# Altium PCB EFI.PcbDoc (part 3 of 3)
Units mm, origin at the board's own origin, x right, y up, seen from the top; angles counter-clockwise.
Board outline 100.1 x 100.83 mm, 2 copper layers (Top Layer, Bottom Layer), stack 1.57 mm thick; 101 components, 85 nets, 326 pads, 97 vias.
Unrouted connection lines stored in the file: 58.
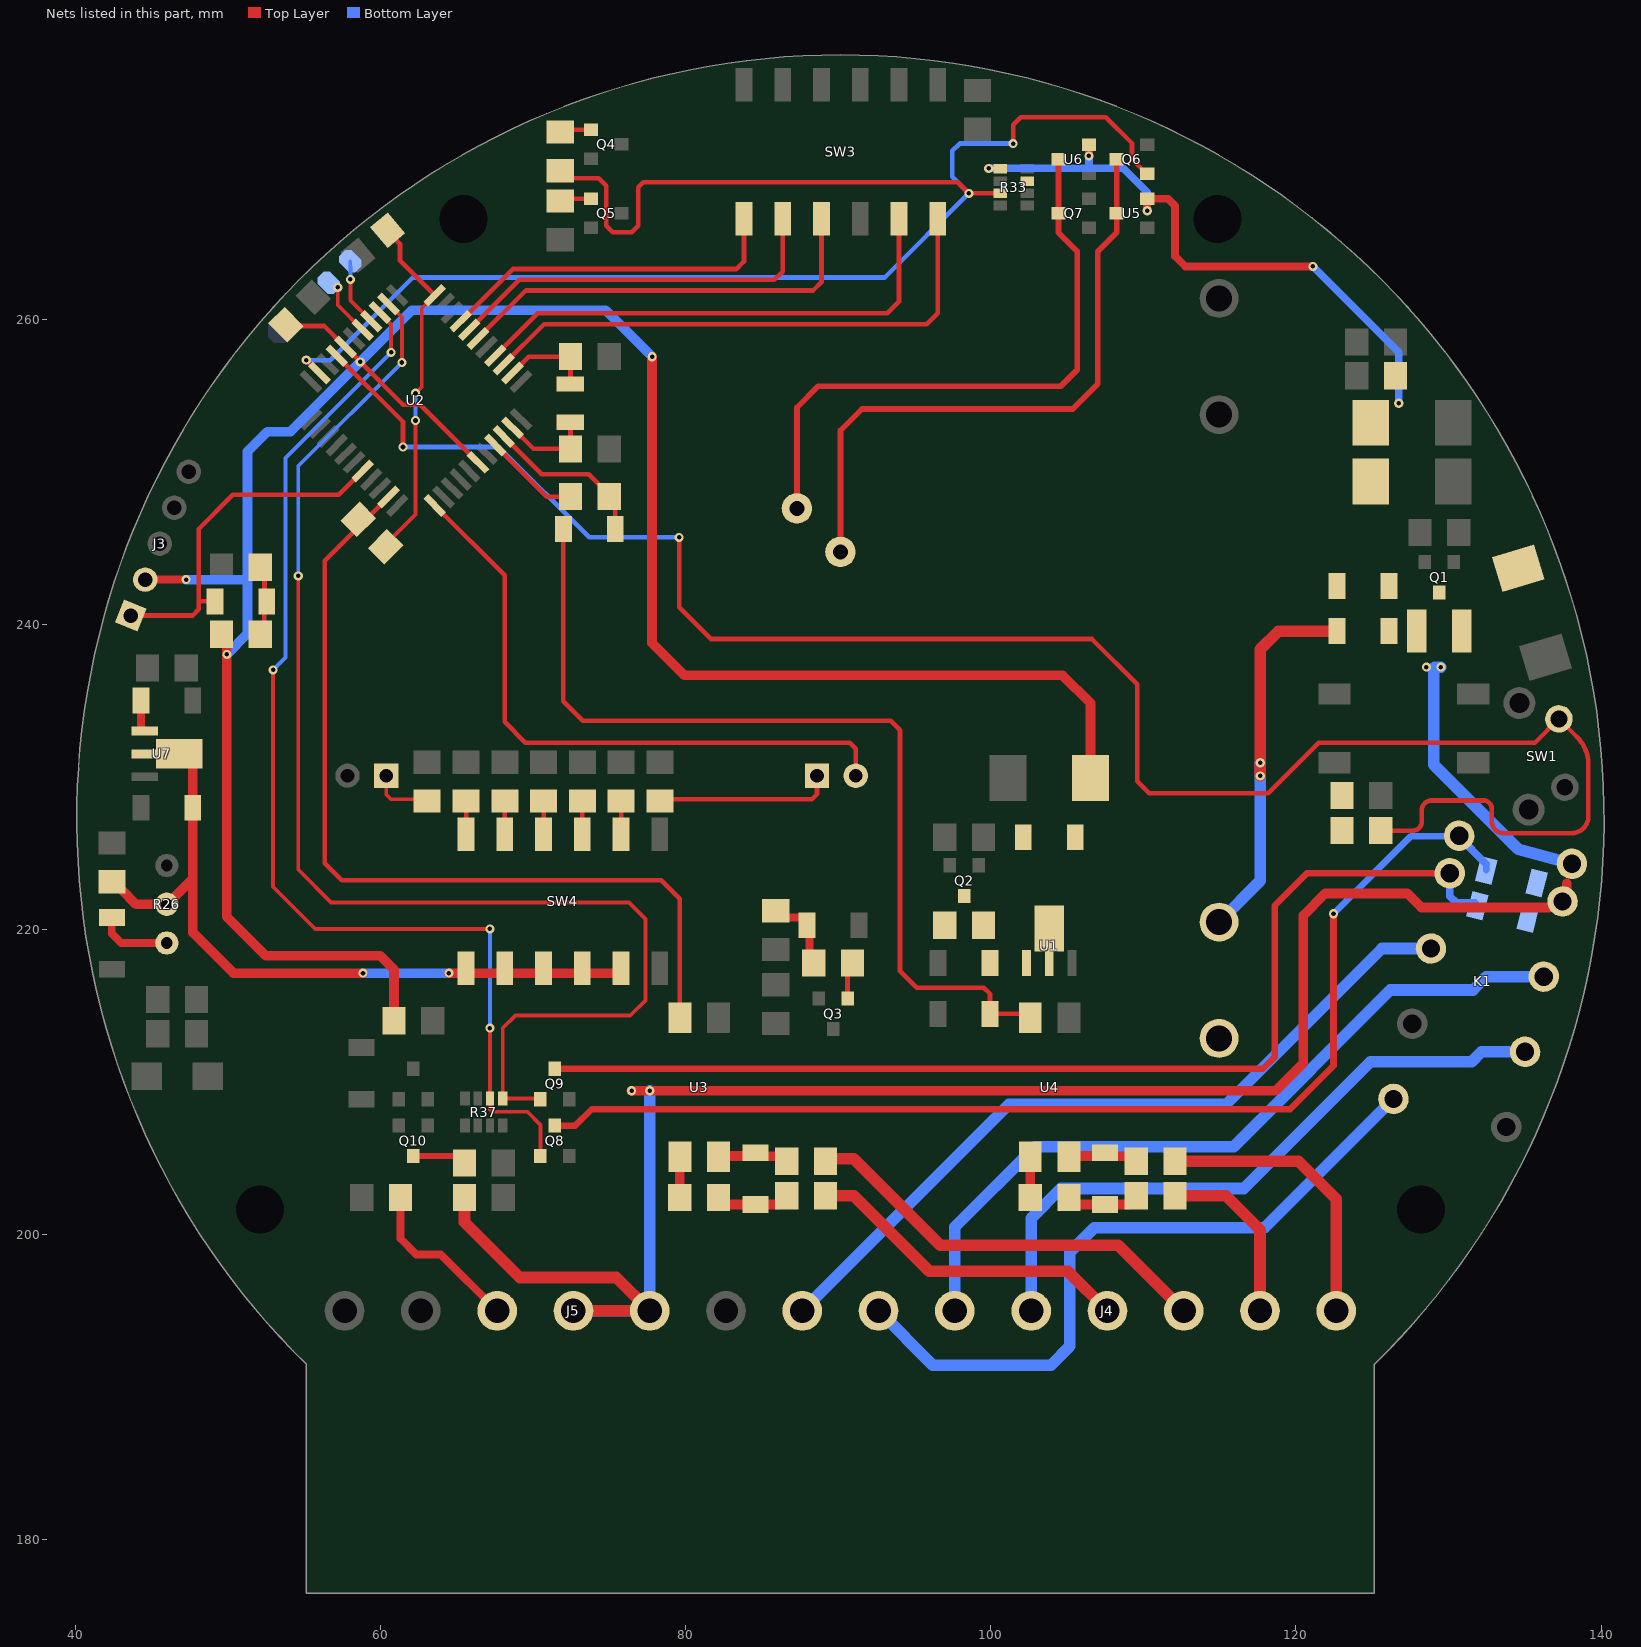
[diagram p2: the nets of this part, all layers, seen from the top]

## Via types
v1: diameter 0.6, hole 0.3, Top Layer to Bottom Layer, 97 vias

## Nets (pads, with @x,y where several pads share a name; then routed paths per layer and width w, separated by ;. In a path a pad name is that pad's centre, name@x,y a point inside that pad or via, vN(x,y) a via of type N, cw(c..) or ccw(c..) an arc to the next point about the centre after c; other vN are vias at no path point) (continued)
LDRV_2: Q6.1 R24.2 R33.7 U2.10 | length 104.2
  Top Layer w0.305: v1(55.133,257.305) 55.148,257.305 55.987,256.466 U2.10@56.002,256.466 ; R24.2@71.78,269.723 72.264,269.239 74.309,269.239 74.803,268.745 74.803,266.109 75.223,265.689 76.473,265.689 76.896,266.111 76.896,268.628 77.225,268.958 97.843,268.958 v1(98.562,268.239) R33.7@100.623,268.239 ; v1(101.464,271.501) 101.464,272.739 101.954,273.229 107.54,273.229 109.254,271.516 109.254,270.459 109.946,269.767 110.204,269.509 Q6.1@110.254,269.509
  Bottom Layer w0.305: v1(55.133,257.305) 56.708,257.305 62.127,262.724 93.047,262.724 v1(98.562,268.239) 97.484,269.317 97.484,271.017 97.967,271.501 v1(101.464,271.501)
MCLR: D6.1 J3.1 U2.18 | length 23.3
  Top Layer w0.305: J3.1@43.628,240.566 47.676,240.566 48.083,240.974 48.083,241.5 ; D6.1@49.151,241.5 48.083,241.5 ; U2.18@58.83,250.043 57.271,248.484 50.329,248.484 48.083,246.239 48.083,241.5
NetC8_2: C8.2 D6.2 R8.1 | length 4.8
  Top Layer w0.305: R8.1@52.121,239.341 52.386,239.606 52.386,241.335 D6.2@52.551,241.5 52.397,241.653 52.397,243.459 C8.2@52.121,243.735
NetC11_2: C11.2 D15.1 R26.2 SW4.1 SW4.2 SW4.3 SW4.4 SW4.5 U7.2 | length 48.9
  Top Layer w0.635: C11.2@42.39,223.117 42.517,223.117 43.025,222.609 43.99,221.644 R26.2@45.997,221.644 47.697,223.344 ; U7.2@46.804,231.497 46.984,231.497 47.697,230.784 D15.1@47.697,227.969 47.697,223.344 ; v1(58.852,217.13) 50.363,217.13 47.697,219.797 47.697,223.344 ; v1(64.478,217.13) 67.853,217.13 SW4.2@68.149,217.426 ; SW4.2@68.149,217.438 SW4.2@68.149,217.426 ; SW4.3@70.689,217.438 SW4.3@70.689,217.426 ; SW4.4@73.229,217.438 SW4.4@73.229,217.426 ; SW4.5@75.769,217.438 75.769,217.426 75.473,217.13 73.525,217.13 SW4.4@73.229,217.426 ; SW4.2@68.149,217.426 68.445,217.13 70.393,217.13 SW4.3@70.689,217.426 ; SW4.3@70.689,217.426 70.985,217.13 72.933,217.13 SW4.4@73.229,217.426
  Bottom Layer w0.635: v1(58.852,217.13) v1(64.478,217.13)
NetD1_2: D1.2 U1.1
NetD4_2: D4.2 L1.2 Q1.3
NetD5_2: D5.2 R9.1 U2.31 | length 10.9
  Top Layer w0.305: U2.31@68.082,252.305 70.565,249.822 73.654,249.822 74.988,248.488 R9.1@74.988,248.361 75.385,247.964 D5.2@75.385,246.228
NetD9_1: D9.1 R15.2 R16.1 | length 4.9
  Top Layer w0.635: R16.1@82.159,202.416 82.612,201.963 86.121,201.963 86.629,202.471 R15.2@86.629,202.54
NetD9_2: D9.2 R17.2 U3.2 | length 4.9
  Top Layer w0.635: U3.2@82.159,205.363 82.379,205.142 84.351,205.142 D9.2@84.572,205.363 84.804,205.13 86.299,205.13 R17.2@86.629,204.8
NetD11_1: D11.1 R18.1 R19.1 | length 4.9
  Top Layer w0.635: R19.1@105.129,202.416 105.582,201.963 109.091,201.963 109.599,202.471 R18.1@109.599,202.54
NetD11_2: D11.2 R20.1 U4.2 | length 4.9
  Top Layer w0.635: U4.2@105.129,205.363 105.349,205.142 107.321,205.142 107.542,205.363 107.774,205.13 109.269,205.13 R20.1@109.599,204.8
NetD12_1: D12.1 R21.1 R22.2 | length 5
  Top Layer w0.508: R21.1@85.903,221.219 86.354,220.768 87.666,220.768 D12.1@87.962,220.472 ; D12.1@87.962,220.269 88.117,220.114 88.117,218.065 R22.2@88.392,217.79
NetD14_1: D14.1 R26.3 | length 4.9
  Top Layer w0.508: D14.1@42.39,220.781 42.39,219.724 43.01,219.104 R26.3@45.997,219.104
NetD16_2: D16.2 U7.1 | length 2.2
  Top Layer w0.508: D16.2@44.299,235.001 44.299,233.033 44.335,232.997 U7.1@44.539,232.997
NetJ5_5: J5.5 R38.2 | length 11
  Top Layer w0.508: R38.2@61.317,202.416 61.317,199.719 62.345,198.691 63.945,198.691 J5.5@67.645,194.991
NetL2_R: L2.R Q6.3 U5.3 | length 41.3
  Top Layer w0.381: L2.R@90.145,244.733 90.145,252.692 91.554,254.102 105.366,254.102 107.013,255.749 107.013,264.433 108.254,265.674 U5.3@108.254,266.929 Q6.3@108.254,270.459
NetL2_S: L2.S Q7.3 U6.3 | length 40.3
  Top Layer w0.381: L2.S@87.295,247.583 87.295,254.205 88.682,255.592 104.581,255.592 105.668,256.68 105.668,264.433 104.428,265.674 Q7.3@104.428,266.929 U6.3@104.428,270.459
NetLED1_1: LED1.1 R13.2 | length 4
  Top Layer w0.254: LED1.1@60.376,230.073 60.376,228.843 60.692,228.527 63.039,228.527 R13.2@63.043,228.524
NetLED2_1: LED2.1 R14.2 | length 11.7
  Top Layer w0.305: R14.2@78.309,228.524 88.28,228.524 88.607,228.85 LED2.1@88.607,230.073
NetQ2_3: Q2.3 R1.1
NetQ3_1: Q3.1 R22.1 | length 2.5
  Top Layer w0.305: Q3.1@90.612,215.463 90.612,217.47 R22.1@90.932,217.79
NetQ4_1: Q4.1 R24.1 | length 2.1
  Top Layer w0.305: R24.1@71.78,272.263 71.918,272.4 Q4.1@73.803,272.4
NetQ5_1: Q5.1 R25.1 | length 2.1
  Top Layer w0.305: R25.1@71.78,267.741 71.918,267.879 Q5.1@73.803,267.879
NetQ10_3: Q10.3 R36.2 | length 3.5
  Top Layer w0.305: R36.2@65.042,205.137 R36.2@65.502,204.677
  Top Layer w0.381: Q10.3@62.154,205.137 R36.2@65.042,205.137
NetR9_2: R9.2 U2.30 | length 6.3
  Top Layer w0.305: U2.30@67.516,251.74 70.895,248.361 R9.2@72.448,248.361
NetR16_2: R16.2 U3.1 | length 2.9
  Top Layer w0.635: R16.2@79.619,202.416 U3.1@79.619,205.363
NetR19_2: R19.2 U4.1 | length 2.9
  Top Layer w0.635: R19.2@102.589,202.416 U4.1@102.589,205.363
NetR27_1: R27.1 SW4.12 | length 2.3
  Top Layer w0.305: SW4.12@65.609,226.238 R27.1@65.609,228.524
NetR28_1: R28.1 SW4.11 | length 2.3
  Top Layer w0.305: SW4.11@68.149,226.238 R28.1@68.149,228.524
NetR29_1: R29.1 SW4.10 | length 2.3
  Top Layer w0.305: SW4.10@70.689,226.238 R29.1@70.689,228.524
NetR30_1: R30.1 SW4.9 | length 2.3
  Top Layer w0.305: SW4.9@73.229,226.238 R30.1@73.229,228.523
NetR31_1: R31.1 SW4.8 | length 2.3
  Top Layer w0.305: SW4.8@75.769,226.238 R31.1@75.769,228.524
RC6: R6.1 R11.1 U2.44 | length 23.8
  Top Layer w0.254: R6.1@59.926,244.817 62.292,247.182 v1(62.292,253.35) ; v1(62.292,255.143) 62.703,255.555 62.703,260.704 U2.44@63.557,261.557
  Top Layer w0.305: R11.1@60.467,265.82 60.467,265.708 61.281,264.894 61.281,263.833 U2.44@63.557,261.557
  Bottom Layer w0.254: v1(62.292,253.35) v1(62.292,255.143)
RD6: TP1.2 U2.4 | length 4.5
  Top Layer w0.254: v1(58.028,262.601) 58.028,261.228 U2.4@59.396,259.86
  Bottom Layer w0.254: TP1.2@58.018,263.787 58.028,263.173 v1(58.028,262.601)
RD7: TP1.1 U2.5 | length 3.5
  Top Layer w0.254: v1(57.199,262.072) 57.199,260.925 U2.5@58.83,259.294
RLY_NC1: J4.6 K1.4 | length 50.9
  Bottom Layer w0.762: J4.6@97.645,194.991 97.645,200.489 102.911,205.756 115.917,205.756 126.188,216.027 131.601,216.027 132.474,216.9 K1.4@136.245,216.9
RLY_NC2: J4.5 K1.6 | length 43
  Bottom Layer w0.762: J4.5@102.645,194.991 102.645,201.07 104.586,203.011 116.568,203.011 124.885,211.328 131.521,211.328 132.164,211.971 K1.6@135.016,211.971
RLY_NO1: J5.1 K1.13 | length 51
  Bottom Layer w0.762: J5.1@87.645,194.991 101.173,208.519 115.418,208.519 125.642,218.743 K1.13@128.851,218.743
RLY_NO2: J4.7 K1.9 | length 46.1
  Bottom Layer w0.762: J4.7@92.645,194.991 96.196,191.439 103.945,191.439 105.181,192.676 105.181,198.831 106.782,200.431 117.939,200.431 K1.9@126.393,208.885
RLY_RESET: D7.2 K1.15 Q9.3 | length 73.3
  Top Layer w0.432: Q9.3@71.435,210.864 117.83,210.864 118.605,211.638 118.605,221.557 120.72,223.672 K1.15@130.08,223.672
  Bottom Layer w0.508: K1.15@130.08,223.672 130.08,222.171 130.527,221.723 131.713,221.723 D7.2@131.892,221.544
RLY_RESET_O: Q9.1 R37.5 U2.2 | length 86.9
  Top Layer w0.254: v1(54.61,243.167) 54.61,223.919 56.765,221.764 76.286,221.764 77.363,220.687 77.363,215.343 76.368,214.349 68.836,214.349 68.012,213.525 R37.5@68.012,208.907 70.442,208.907 Q9.1@70.485,208.864 ; U2.2@60.527,260.991 61.404,260.115 v1(61.404,257.15)
  Bottom Layer w0.254: v1(54.61,243.167) 54.61,250.356 v1(61.404,257.15)
RLY_SET: D8.2 K1.16 Q8.3 | length 76
  Top Layer w0.432: Q8.3@71.435,207.137 72.769,207.137 73.841,208.209 119.614,208.209 122.46,211.055 v1(122.46,221.022)
  Bottom Layer w0.432: v1(122.46,221.022) 127.549,226.111 130.668,226.111 K1.16@130.694,226.137 K1.16@130.694,226.049 ; D8.2@132.47,223.86 D8.2@132.47,224.273
  Bottom Layer w0.508: K1.16@130.694,226.049 D8.2@132.47,224.273
RLY_SET_O: Q8.1 R37.6 U2.3 | length 74.1
  Top Layer w0.254: v1(52.959,237.007) 52.959,222.79 55.723,220.026 v1(67.172,220.026) ; U2.3@59.962,260.426 59.962,260.382 60.693,259.65 v1(60.693,257.81) ; v1(67.172,213.525) R37.6@67.172,208.907 67.172,208.191 67.321,208.042 69.63,208.042 70.485,207.187 Q8.1@70.485,205.137
  Bottom Layer w0.254: v1(52.959,237.007) 53.775,237.823 53.775,250.892 v1(60.693,257.81) ; v1(67.172,213.525) v1(67.172,220.026)
RMT_CNT_SW: SW3.1 U2.41 | length 23
  Top Layer w0.305: U2.41@65.254,259.86 68.67,263.276 83.324,263.276 83.82,263.772 SW3.1@83.82,266.561
RSP_DELAY_1: SW3.5 U2.37 | length 33.4
  Top Layer w0.305: U2.37@67.516,257.597 70.294,260.375 93.216,260.375 93.98,261.14 SW3.5@93.98,266.561
RSP_DELAY_2: SW3.6 U2.36 | length 36
  Top Layer w0.305: U2.36@68.082,257.032 70.715,259.664 95.809,259.664 96.52,260.375 SW3.6@96.52,266.561
RST_TIME_1: SW3.2 U2.40 | length 25.6
  Top Layer w0.305: U2.40@65.819,259.294 69.091,262.566 85.817,262.566 86.36,263.109 SW3.2@86.36,266.561
RST_TIME_2: SW3.3 U2.39 | length 28.2
  Top Layer w0.305: U2.39@66.385,258.729 69.526,261.87 88.346,261.87 88.9,262.424 SW3.3@88.9,266.561
STATUS_LED: LED2.2 U2.23 | length 41.6
  Top Layer w0.305: U2.23@63.557,247.78 68.133,243.203 68.133,233.595 69.498,232.23 90.749,232.23 91.147,231.832 LED2.2@91.147,230.073
T1OS_I: C5.2 U2.35 X1.1 | length 6
  Top Layer w0.305: U2.35@68.648,256.466 69.722,257.54 C5.2@72.448,257.54 72.451,257.537 X1.1@72.451,255.742
T1OS_O: C6.2 U2.32 X1.2 | length 6.1
  Top Layer w0.305: U2.32@68.648,252.871 70.026,251.493 C6.2@72.448,251.493 72.451,251.496 X1.2@72.451,253.242
TEST_RST: R7.1 SW1.2 U2.8 | length 125.7
  Top Layer w0.305: U2.8@57.133,257.597 61.476,253.254 v1(61.476,251.611) ; v1(79.574,245.692) 79.574,241.117 81.664,239.027 106.635,239.027 109.601,236.06 109.601,229.707 110.381,228.927 118.177,228.927 121.481,232.232 135.67,232.232 SW1.2@137.233,233.795 138.423,232.605 cw(c136.627,230.809) 139.167,230.809 139.167,227.398 cw(c138.07,227.398) 138.07,226.302 133.609,226.302 cw(c133.609,227.069) 132.842,227.069 132.842,227.883 ccw(c132.278,227.883) 132.278,228.448 128.894,228.448 ccw(c128.894,227.798) 128.245,227.798 128.245,227.051 cw(c127.66,227.051) 127.66,226.466 R7.1@125.562,226.466
  Bottom Layer w0.305: v1(61.476,251.611) 67.761,251.611 73.68,245.692 v1(79.574,245.692)
V_AUX: C2.1 D3.1 D7.1 D8.1 J5.3 J5.4 K1.1 K1.2 L1.1 R34.2 | length 132.5
  Top Layer w0.635: v1(76.454,209.423) 76.458,209.419 v1(77.645,209.419) 118.672,209.419 120.48,211.227 120.48,220.918 121.914,222.352 127.299,222.352 128.214,221.437 136.581,221.437 137.744,222.6 137.744,223.026
  Top Layer w0.762: R34.2@65.502,202.416 65.502,200.797 69.119,197.179 75.456,197.179 J5.3@77.645,194.991 J5.4@72.645,194.991
  Bottom Layer w0.762: J5.4@72.645,194.991 J5.3@77.645,194.991 v1(77.645,209.419) ; v1(129.502,237.185) 129.108,237.185 129.032,237.109 129.032,230.781 134.564,225.249 K1.1@138.088,224.293
  other v1: 128.55,237.185
VAC_240_IN: D5.1 D10.1 U4.4 | length 60.4
  Top Layer w0.305: D5.1@71.985,246.228 71.985,234.96 73.269,233.676 93.432,233.676 94.052,233.056 94.052,217.266 95.139,216.179 99.543,216.179 99.947,215.775 D10.1@99.947,214.463 U4.4@102.589,214.463
VAC_240_L: J4.2 R18.2 | length 11.8
  Top Layer w0.762: R18.2@112.08,202.54 115.415,202.54 117.645,200.31 J4.2@117.645,194.991
VAC_240_N: J4.1 R20.2 | length 18.9
  Top Layer w0.762: R20.2@112.08,204.8 120.167,204.8 122.645,202.323 J4.1@122.645,194.991
VBAT: D2.2 D3.2 J1.1 R1.2 U1.2 | length 25.4
  Top Layer w0.762: v1(117.664,230.058) v1(117.664,230.922) 117.664,238.352 118.857,239.546 D3.2@122.696,239.546
  Bottom Layer w0.762: J1.1@114.96,220.472 117.664,223.176 v1(117.664,230.058) v1(117.664,230.922)
VBOOST: C3.1 C4.1 D4.1 R2.2 R33.3 R33.5 U5.2 U6.2 | length 41.3
  Top Layer w0.305: v1(99.862,269.875) 99.88,269.857 100.605,269.857 R33.5@100.623,269.839
  Top Layer w0.508: v1(106.428,270.689) U6.2@106.428,271.409 ; v1(110.254,267.093) U5.2@110.254,267.879 111.61,267.879 112.078,267.411 112.078,264.121 112.75,263.449 v1(121.107,263.449)
  Bottom Layer w0.508: v1(99.862,269.875) 106.428,269.875 ; v1(106.428,270.689) 106.428,269.875 ; v1(110.254,267.093) 110.254,268.301 108.68,269.875 106.428,269.875 ; v1(121.107,263.449) 126.739,257.817 v1(126.739,254.478)
VDC_110_N: J4.3 R17.1 | length 27.7
  Top Layer w0.762: R17.1@89.169,204.8 89.321,204.953 91.027,204.953 96.691,199.289 108.346,199.289 J4.3@112.645,194.991
VDC_110_P: J4.4 R15.1 | length 21.6
  Top Layer w0.762: R15.1@89.169,202.54 91.008,202.54 95.958,197.59 105.045,197.59 J4.4@107.645,194.991
VDC_110_RA2: R6.2 U2.21 U3.4 | length 57.5
  Top Layer w0.305: U2.21@60.527,248.345 56.334,244.153 56.334,224.328 57.451,223.212 78.41,223.212 79.619,222.003 U3.4@79.619,214.463
VDD_MCU: C1.1 C7.2 D2.1 J3.2 R7.2 R8.2 R10.2 R35.2 U2.7 U2.28 | length 157.3
  Top Layer w0.305: C7.2@53.799,259.628 54.661,259.628 54.75,259.538 54.755,259.543 56.318,259.543 U2.7@57.699,258.163 v1(58.672,257.19) 61.476,254.386 62.608,254.386 U2.28@66.385,250.608
  Top Layer w0.508: J3.2@44.58,242.921 v1(47.257,242.921)
  Top Layer w0.635: R8.2@49.355,239.566 R8.2@49.581,239.341 49.927,238.994 v1(49.927,238.023) 49.927,220.816 52.47,218.274 59.969,218.274 60.884,217.359 R35.2@60.884,214.008 ; v1(77.8,257.532) 77.8,238.77 79.918,236.652 104.708,236.652 106.531,234.829 C1.1@106.531,229.921
  Bottom Layer w0.635: v1(47.257,242.921) 51.287,242.921 ; v1(49.927,238.023) 49.934,238.023 51.287,239.376 51.287,242.921 ; v1(77.8,257.532) 74.751,260.581 62.063,260.581 v1(58.672,257.19) 54.103,252.621 52.595,252.621 51.287,251.313 51.287,242.921
pads on no net: K1.8 K1.11 U2.12 U2.13 U2.20 U2.33 U2.34
copper on no net: | length 66.5
  Top Layer w0.203: 65.145,178.968 65.145,189.241 ; 67.005,185.852 73.508,184.81 ; 75.145,178.968 75.145,189.241 ; 85.145,178.968 85.145,189.241 ; 105.145,178.968 105.145,189.241 ; 115.145,178.968 115.145,189.241 ; 67.688,187.071 ccw(c67.005,187.071) 67.688,187.071 ; 73.835,187.071 ccw(c73.152,187.071) 73.835,187.071

## Polygon pours and split planes (outlines as drawn)
GND on Top Layer "NONET_L-01_P-001" (solid, pour order 2): 136.666,235.128 134.99,233.451 121.972,233.451 121.972,236.122 134.187,236.122 134.187,240.995 137.647,240.995 138.511,235.128
V_AUX on Top Layer "NONET_L-01_P-001" (solid, pour order 0): 136.305,242.938 133.789,242.169 133.597,241.977 133.597,236.626 128.295,236.626 125.546,239.376 125.546,240.951 128.561,240.951 128.561,238.141 129.073,237.63 132.19,237.63 132.19,243.746 132.83,244.386 135.603,245.233
GND on Bottom Layer "NONET_L-01_P-001" (solid, remove dead copper, pour order 1): 134.84,226.779 131.724,229.895 131.724,238.176 126.67,238.176 126.67,227.19 113.754,214.274 81.445,214.274 81.445,191.491 55.145,191.491 cw(c90.145,227.267) 140.192,226.779

## Other copper
Top Layer:
  rectangle net GND: 134.208,227.103 138.414,230.209
  region net V_AUX: 135.883,220.864 138.373,220.243 139.552,224.974 137.063,225.595
  rectangle net GND: 129.103,247.861 131.503,254.696
  rectangle net NetC11_2: 46.337,227.119 48.844,232.464
  rectangle net VBAT: 103.541,216.925 104.121,221.158
  rectangle net VBOOST: 122.146,241.644 123.444,254.696
  rectangle net GND: 90.812,219.419 91.912,224.257
  rectangle net GND: 81.409,222.948 91.912,224.257
  rectangle net GND: 81.409,213.209 82.909,224.257
  rectangle net GND: 85.001,215.003 86.792,217.13
  rectangle net GND: 85.001,215.003 89.122,215.923
  rectangle net GND: 104.379,213.208 107.023,215.209
  rectangle net GND: 96.215,228.421 102.331,231.421
  rectangle net GND: 96.215,223.739 97.739,231.421
  rectangle net GND: 85.001,215.123 86.792,217.13
  rectangle net GND: 44.642,212.264 46.166,216.302
  rectangle net GND: 41.501,226.227 45.415,230.247
  rectangle net GND: 41.501,224.895 44.297,230.247
  rectangle net GND: 105.153,213.208 107.023,218.655
  rectangle net VBOOST: 125.771,253.399 127.295,257.173
  rectangle net VBOOST: 123.063,253.399 127.295,254.696
  rectangle net NetD4_2: 125.546,241.457 126.646,243.344
  rectangle net NetD4_2: 125.546,241.457 131.503,242.55
  rectangle net NetD4_2: 130.233,238.141 131.503,242.55
  rectangle net VBOOST: 101.375,268.855 102.843,269.17
  rectangle net VBOOST: 101.333,268.855 101.654,269.964
  rectangle net VBOOST: 100.173,269.643 101.654,269.964
  rectangle net V_AUX: 125.546,238.141 128.561,240.951
  rectangle net VDD_MCU: 104.623,225.185 123.784,227.355
  rectangle net VDD_MCU: 122.26,225.577 123.784,229.667
  rectangle net EXT_RST_I: 61.744,210.404 64.186,211.324
  rectangle net EXT_RST_I: 62.662,210.404 64.186,214.897
  rectangle net AUTO_RST_CT: 85.014,213.003 97.097,214.59
  rectangle net AUTO_RST_CT: 95.997,213.003 97.097,215.313
  rectangle net VBAT: 101.581,219.38 103.492,226.885
  rectangle net VDD_MCU: 104.623,225.185 107.731,231.421
  rectangle net NetQ2_3: 96.215,219.38 97.739,222.659
  rectangle net NetQ2_3: 96.215,221.598 99.607,222.659
  rectangle net NetD1_2: 99.397,216.925 102.5,218.655
  rectangle net VBAT: 101.581,219.38 116.827,222.402
  rectangle net VBAT: 98.755,219.38 116.827,221.158
  rectangle net VBAT: 113.068,211.592 116.827,222.402
  rectangle net NetC11_2: 43.586,230.784 48.844,232.156
  rectangle net NetC11_2: 46.337,230.53 48.844,232.464
  rectangle net VBOOST: 122.146,247.861 126.103,254.696
  text "5" at 77.299,189.755 h1.5
  text "1" at 57.382,189.738 h1.5
  text "2" at 62.303,189.738 h1.5
  text "3" at 67.303,189.747 h1.5
  text "4" at 72.288,189.741 h1.5
  text "6" at 82.312,189.747 h1.5
  text "7" at 87.31,189.747 h1.5
  text "8" at 92.308,189.747 h1.5
  text "9" at 97.312,189.747 h1.5
  text "10" at 101.967,189.747 h1.5
  text "11" at 107.009,189.738 h1.5
  text "12" at 111.968,189.738 h1.5
  text "13" at 116.975,189.747 h1.5
  text "14" at 121.975,189.738 h1.5
  text "0VAC" at 123.284,183.991 h2 r90
  text "0 VDC" at 113.284,183.742 h2 r90
  text "White" at 58.274,182.764 h2 r90
  text "Brown" at 63.274,182.663 h2 r90
  text "Brown" at 78.274,182.663 h2 r90
  text "White" at 83.274,182.664 h2 r90
  text "NO1" at 88.284,182.663 h2 r90
  text "NO2" at 93.284,182.663 h2 r90
  text "NC1" at 98.284,182.663 h2 r90
  text "NC2" at 103.284,182.663 h2 r90
  text "110 VDC" at 108.284,181.85 h2 r90
  text "240 VAC" at 118.284,181.799 h2 r90
  text "Relay" at 92.894,178.49 h2
  text "Input" at 118.094,178.478 h2
  text "SENS - CT" at 55.791,178.303 h2
  text "Reset" at 107.852,178.314 h2
  text "External / Test/Reset" at 65.351,178.024 h2
  text "Flashing / Lamp" at 75.351,178.024 h2
Bottom Layer:
  region net V_AUX: 134.407,220.041 135.519,219.764 136.979,225.622 135.868,225.899
  region net V_AUX: 134.748,221.409 138.46,220.483 139.579,224.974 135.868,225.899
  rectangle net V_AUX: 128.151,236.728 129.942,237.585
  rectangle net V_AUX: 75.984,209.002 78.035,209.852

## Silkscreen, mask and mechanical layers (free items; w line width, h text height)
Top Overlay:
  drawing of 6 lines, arcs and shapes, not listed
  text "+   3.6V Lithium   -" at 117.107,223.025 h3 r90
Top Solder:
  circle w0.203: c67.005,187.071 r0.683
  circle w0.203: c73.152,187.071 r0.683
  lines w0.127: 75.145,178.968 75.145,189.241
  lines w0.203: 65.145,178.968 65.145,189.241 ; 67.005,185.852 73.508,184.81 ; 85.145,178.968 85.145,189.241 ; 105.145,178.968 105.145,189.241 ; 115.145,178.968 115.145,189.241
  text "5" at 77.299,189.755 h1.5
  text "1" at 57.382,189.738 h1.5
  text "2" at 62.303,189.738 h1.5
  text "3" at 67.303,189.747 h1.5
  text "4" at 72.288,189.741 h1.5
  text "6" at 82.312,189.747 h1.5
  text "7" at 87.31,189.747 h1.5
  text "8" at 92.308,189.747 h1.5
  text "9" at 97.312,189.747 h1.5
  text "10" at 101.967,189.747 h1.5
  text "11" at 107.009,189.738 h1.5
  text "12" at 111.968,189.738 h1.5
  text "13" at 116.975,189.747 h1.5
  text "14" at 121.975,189.738 h1.5
  text "0VAC" at 123.284,183.991 h2 r90
  text "0 VDC" at 113.284,183.742 h2 r90
  text "White" at 58.274,182.764 h2 r90
  text "Brown" at 63.274,182.663 h2 r90
  text "Brown" at 78.274,182.663 h2 r90
  text "White" at 83.274,182.664 h2 r90
  text "NO1" at 88.284,182.663 h2 r90
  text "NO2" at 93.284,182.663 h2 r90
  text "NC1" at 98.284,182.663 h2 r90
  text "NC2" at 103.284,182.663 h2 r90
  text "110 VDC" at 108.284,181.85 h2 r90
  text "240 VAC" at 118.284,181.799 h2 r90
  text "Relay" at 92.894,178.49 h2
  text "Input" at 118.094,178.478 h2
  text "SENS - CT" at 55.791,178.303 h2
  text "Reset" at 107.852,178.314 h2
  text "External / Test/Reset" at 65.351,178.024 h2
  text "Flashing / Lamp" at 75.351,178.024 h2
Dimension:
  lines w0.127: 40.096,227.267 90.145,227.267 140.193,227.267
Board Outline:
  lines w0.127: 78.606,207.137 78.606,207.48 83.199,207.48 83.199,207.137 78.606,207.137 ; 101.576,207.137 106.17,207.137 106.17,207.48 101.576,207.48 101.576,207.137
  lines w0.254: 55.145,176.491 125.145,176.491 125.145,191.491 ccw(c90.145,227.267) 55.145,191.491 55.145,176.491
Fabrication:
  drawing of 191 lines, arcs and shapes, not listed
  text "Layer" at 152.986,276.136 h1.52
  text "Name" at 163.398,276.136 h1.52
  text "Material" at 187.013,276.136 h1.52
  text "Thickness" at 208.851,276.136 h1.52
  text "Constant" at 225.357,276.136 h1.52
  text "Board Layer Stack" at 239.832,276.136 h1.52
  text "Top Overlay" at 163.398,273.088 h1.52
  text "Top Solder" at 163.398,270.04 h1.52
  text "Solder Resist" at 187.013,270.04 h1.52
  text "0.010mm" at 208.851,270.04 h1.52
  text "3.5" at 225.357,270.04 h1.52
  text "1" at 152.986,266.992 h1.52
  text "Top Layer" at 163.398,266.992 h1.52
  text "0.035mm" at 208.851,266.992 h1.52
  text "Dielectric 1" at 163.398,263.944 h1.52
  text "FR-4" at 187.013,263.944 h1.52
  text "1.500mm" at 208.851,263.944 h1.52
  text "4.8" at 225.357,263.944 h1.52
  text "2" at 152.986,260.896 h1.52
  text "Bottom Layer" at 163.398,260.896 h1.52
  text "0.035mm" at 208.851,260.896 h1.52
  text "Bottom Solder" at 163.398,257.848 h1.52
  text "Solder Resist" at 187.013,257.848 h1.52
  text "0.010mm" at 208.851,257.848 h1.52
  text "3.5" at 225.357,257.848 h1.52
  text "Bottom Overlay" at 163.398,254.8 h1.52
  text "Total board thickness:" at 152.986,251.752 h1.52
  text "1.590mm" at 208.851,251.752 h1.52
Drill Drawing:
  circle w0.254: c34.052,300.465 r0.847
  lines w0.254: 33.205,293.692 34.899,293.692 34.052,291.998 33.205,293.692 ; 33.205,295.808 34.899,295.808 34.899,297.502 33.205,297.502 33.205,295.808 ; 33.205,303.428 34.052,303.852 34.899,303.428 34.475,304.275 34.899,305.122 34.052,304.698 33.205,305.122 33.629,304.275 33.205,303.428 ; 33.205,307.662 33.629,307.662 34.052,307.238 34.475,307.662 34.899,307.662 34.475,308.085 34.899,308.508 34.475,308.508 34.052,308.932 33.629,308.508 33.205,308.508 33.629,308.085 33.205,307.662 ; 33.205,311.048 34.899,311.048 34.899,312.742 33.205,312.742 33.205,311.048 ; 33.205,315.705 34.052,314.858 34.899,315.705 34.052,316.552 33.205,315.705 ; 33.205,319.092 33.629,319.092 34.052,318.668 34.475,319.092 34.899,319.092 34.475,319.515 34.899,319.938 34.475,319.938 34.052,320.362 33.629,319.938 33.205,319.938 33.629,319.515 33.205,319.092 ; 33.205,322.478 33.205,322.902 33.629,323.325 33.205,323.748 33.205,324.172 33.629,324.172 34.052,323.748 34.475,324.172 34.899,324.172 34.899,323.748 34.475,323.325 34.899,322.902 34.899,322.478 34.475,322.478 34.052,322.902 33.629,322.478 33.205,322.478 ; 33.205,326.712 33.629,326.712 33.629,326.288 34.475,326.288 34.475,326.712 34.899,326.712 34.899,327.558 34.475,327.558 34.475,327.982 33.629,327.982 33.629,327.558 33.205,327.558 33.205,326.712 ; 33.205,331.792 34.899,331.792 34.052,330.098 33.205,331.792 ; 33.544,293.353 34.56,293.353 34.052,292.337 33.544,293.353 ; 33.544,296.147 34.56,296.147 34.56,297.163 33.544,297.163 33.544,296.147 ; 33.544,307.831 33.798,307.831 34.052,307.577 34.306,307.831 34.56,307.831 34.306,308.085 34.56,308.339 34.306,308.339 34.052,308.593 33.798,308.339 33.544,308.339 33.798,308.085 33.544,307.831
  lines w0.381: 31.686,290.855 225.232,290.855 ; 31.686,332.765 225.232,332.765 ; 45.679,287.045 45.679,336.575 ; 60.661,287.045 60.661,336.575 ; 89.608,287.045 89.608,336.575 ; 102.458,287.045 102.458,336.575 ; 121.096,287.045 121.096,336.575 ; 159.185,287.045 159.185,336.575 ; 174.167,287.045 174.167,336.575 ; 193.11,287.045 193.11,336.575 ; 31.686,287.045 225.232,287.045 225.232,336.575 31.686,336.575 31.686,287.045
  text "Symbol" at 33.972,333.908 h1.83
  text "Count" at 46.822,333.908 h1.83
  text "Hole Size" at 61.804,333.908 h1.83
  text "Plated" at 90.751,333.908 h1.83
  text "Hole Type" at 103.601,333.908 h1.83
  text "Drill Layer Pair" at 122.239,333.908 h1.83
  text "Via/Pad" at 160.328,333.908 h1.83
  text "Pad Shape" at 175.31,333.908 h1.83
  text "Template" at 194.253,333.908 h1.83
  text "2" at 46.822,330.098 h1.52
  text "39.37mil (1.000mm)" at 61.804,330.098 h1.52
  text "PTH" at 90.751,330.098 h1.52
  text "Round" at 103.601,330.098 h1.52
  text "Top Layer - Bottom Layer" at 122.239,330.098 h1.52
  text "Pad" at 160.328,330.098 h1.52
  text "Rounded" at 175.31,330.098 h1.52
  text "c200h100" at 194.253,330.098 h1.52
  text "2" at 46.822,326.288 h1.52
  text "43.31mil (1.100mm)" at 61.804,326.288 h1.52
  text "PTH" at 90.751,326.288 h1.52
  text "Round" at 103.601,326.288 h1.52
  text "Top Layer - Bottom Layer" at 122.239,326.288 h1.52
  text "Pad" at 160.328,326.288 h1.52
  text "Rounded" at 175.31,326.288 h1.52
  text "c180h110" at 194.253,326.288 h1.52
  text "2" at 46.822,322.478 h1.52
  text "51.18mil (1.300mm)" at 61.804,322.478 h1.52
  text "PTH" at 90.751,322.478 h1.52
  text "Round" at 103.601,322.478 h1.52
  text "Top Layer - Bottom Layer" at 122.239,322.478 h1.52
  text "Pad" at 160.328,322.478 h1.52
  text "Rounded" at 175.31,322.478 h1.52
  text "c210h130" at 194.253,322.478 h1.52
  text "3" at 46.822,318.668 h1.52
  text "30.00mil (0.762mm)" at 61.804,318.668 h1.52
  text "PTH" at 90.751,318.668 h1.52
  text "Round" at 103.601,318.668 h1.52
  text "Top Layer - Bottom Layer" at 122.239,318.668 h1.52
  text "Pad" at 160.328,318.668 h1.52
  text "Rounded" at 175.31,318.668 h1.52
  text "(Mixed)" at 194.253,318.668 h1.52
  text "4" at 46.822,314.858 h1.52
  text "35.43mil (0.900mm)" at 61.804,314.858 h1.52
  text "PTH" at 90.751,314.858 h1.52
  text "Round" at 103.601,314.858 h1.52
  text "Top Layer - Bottom Layer" at 122.239,314.858 h1.52
  text "Pad" at 160.328,314.858 h1.52
  text "(Mixed)" at 175.31,314.858 h1.52
  text "(Mixed)" at 194.253,314.858 h1.52
  text "4" at 46.822,311.048 h1.52
  text "66.93mil (1.700mm)" at 61.804,311.048 h1.52
  text "PTH" at 90.751,311.048 h1.52
  text "Round" at 103.601,311.048 h1.52
  text "Top Layer - Bottom Layer" at 122.239,311.048 h1.52
  text "Pad" at 160.328,311.048 h1.52
  text "Rounded" at 175.31,311.048 h1.52
  text "c255h170" at 194.253,311.048 h1.52
  text "4" at 46.822,307.238 h1.52
  text "124.02mil (3.150mm)" at 61.804,307.238 h1.52
  text "NPTH" at 90.751,307.238 h1.52
  text "Round" at 103.601,307.238 h1.52
  text "Top Layer - Bottom Layer" at 122.239,307.238 h1.52
  text "Pad" at 160.328,307.238 h1.52
  text "Rounded" at 175.31,307.238 h1.52
  text "c0hn315" at 194.253,307.238 h1.52
  text "5" at 46.822,303.428 h1.52
  text "37.40mil (0.950mm)" at 61.804,303.428 h1.52
  text "PTH" at 90.751,303.428 h1.52
  text "Round" at 103.601,303.428 h1.52
  text "Top Layer - Bottom Layer" at 122.239,303.428 h1.52
  text "Pad" at 160.328,303.428 h1.52
  text "(Mixed)" at 175.31,303.428 h1.52
  text "(Mixed)" at 194.253,303.428 h1.52
  text "10" at 46.822,299.618 h1.52
  text "47.24mil (1.200mm)" at 61.804,299.618 h1.52
  text "PTH" at 90.751,299.618 h1.52
  text "Round" at 103.601,299.618 h1.52
  text "Top Layer - Bottom Layer" at 122.239,299.618 h1.52
  text "Pad" at 160.328,299.618 h1.52
  text "Rounded" at 175.31,299.618 h1.52
  text "c200h120" at 194.253,299.618 h1.52
  text "14" at 46.822,295.808 h1.52
  text "62.99mil (1.600mm)" at 61.804,295.808 h1.52
  text "PTH" at 90.751,295.808 h1.52
  text "Round" at 103.601,295.808 h1.52
  text "Top Layer - Bottom Layer" at 122.239,295.808 h1.52
  text "Pad" at 160.328,295.808 h1.52
  text "Rounded" at 175.31,295.808 h1.52
  text "c260h160m265mx265p0" at 194.253,295.808 h1.52
  text "97" at 46.822,291.998 h1.52
  text "11.81mil (0.300mm)" at 61.804,291.998 h1.52
  text "PTH" at 90.751,291.998 h1.52
  text "Round" at 103.601,291.998 h1.52
  text "Top Layer - Bottom Layer" at 122.239,291.998 h1.52
  text "Via" at 160.328,291.998 h1.52
  text "Rounded" at 175.31,291.998 h1.52
  text "v60h30" at 194.253,291.998 h1.52
  text "147 Total" at 46.822,288.188 h1.52

## Dimensions
40.096,227.267 to 140.193,227.267 on Dimension
90.145,277.317 to 55.145,176.491 on Dimension
55.145,176.491 to 125.145,176.491 on Dimension

## Text inside footprints (layer, text, board x,y; h text height)
SW1: Top Overlay "PCB Edge" at 139.755,229.615 h1 r95
SW3: Top Overlay "ON" at 96.46,272.651 h0.76 r270; Top Overlay "ON" at 93.92,272.651 h0.76 r270; Top Overlay "ON" at 91.38,272.651 h0.76 r270; Top Overlay "ON" at 88.84,272.651 h0.76 r270; Top Overlay "ON" at 86.3,272.651 h0.76 r270; Top Overlay "ON" at 83.76,272.651 h0.76 r270
SW4: Top Overlay "ON" at 65.549,223.527 h0.76 r270; Top Overlay "ON" at 68.089,223.527 h0.76 r270; Top Overlay "ON" at 70.629,223.527 h0.76 r270; Top Overlay "ON" at 73.169,223.527 h0.76 r270; Top Overlay "ON" at 75.709,223.527 h0.76 r270; Top Overlay "ON" at 78.249,223.527 h0.76 r270